# Altium PCB Catan_board.PcbDoc (part 1 of 3)
Units mm, origin at the board's own origin, x right, y up, seen from the top; angles counter-clockwise.
Board outline 80 x 59.64 mm, 2 copper layers (Top Layer, Bottom Layer), stack 1.448 mm thick; 132 components, 59 nets, 410 pads, 538 vias.
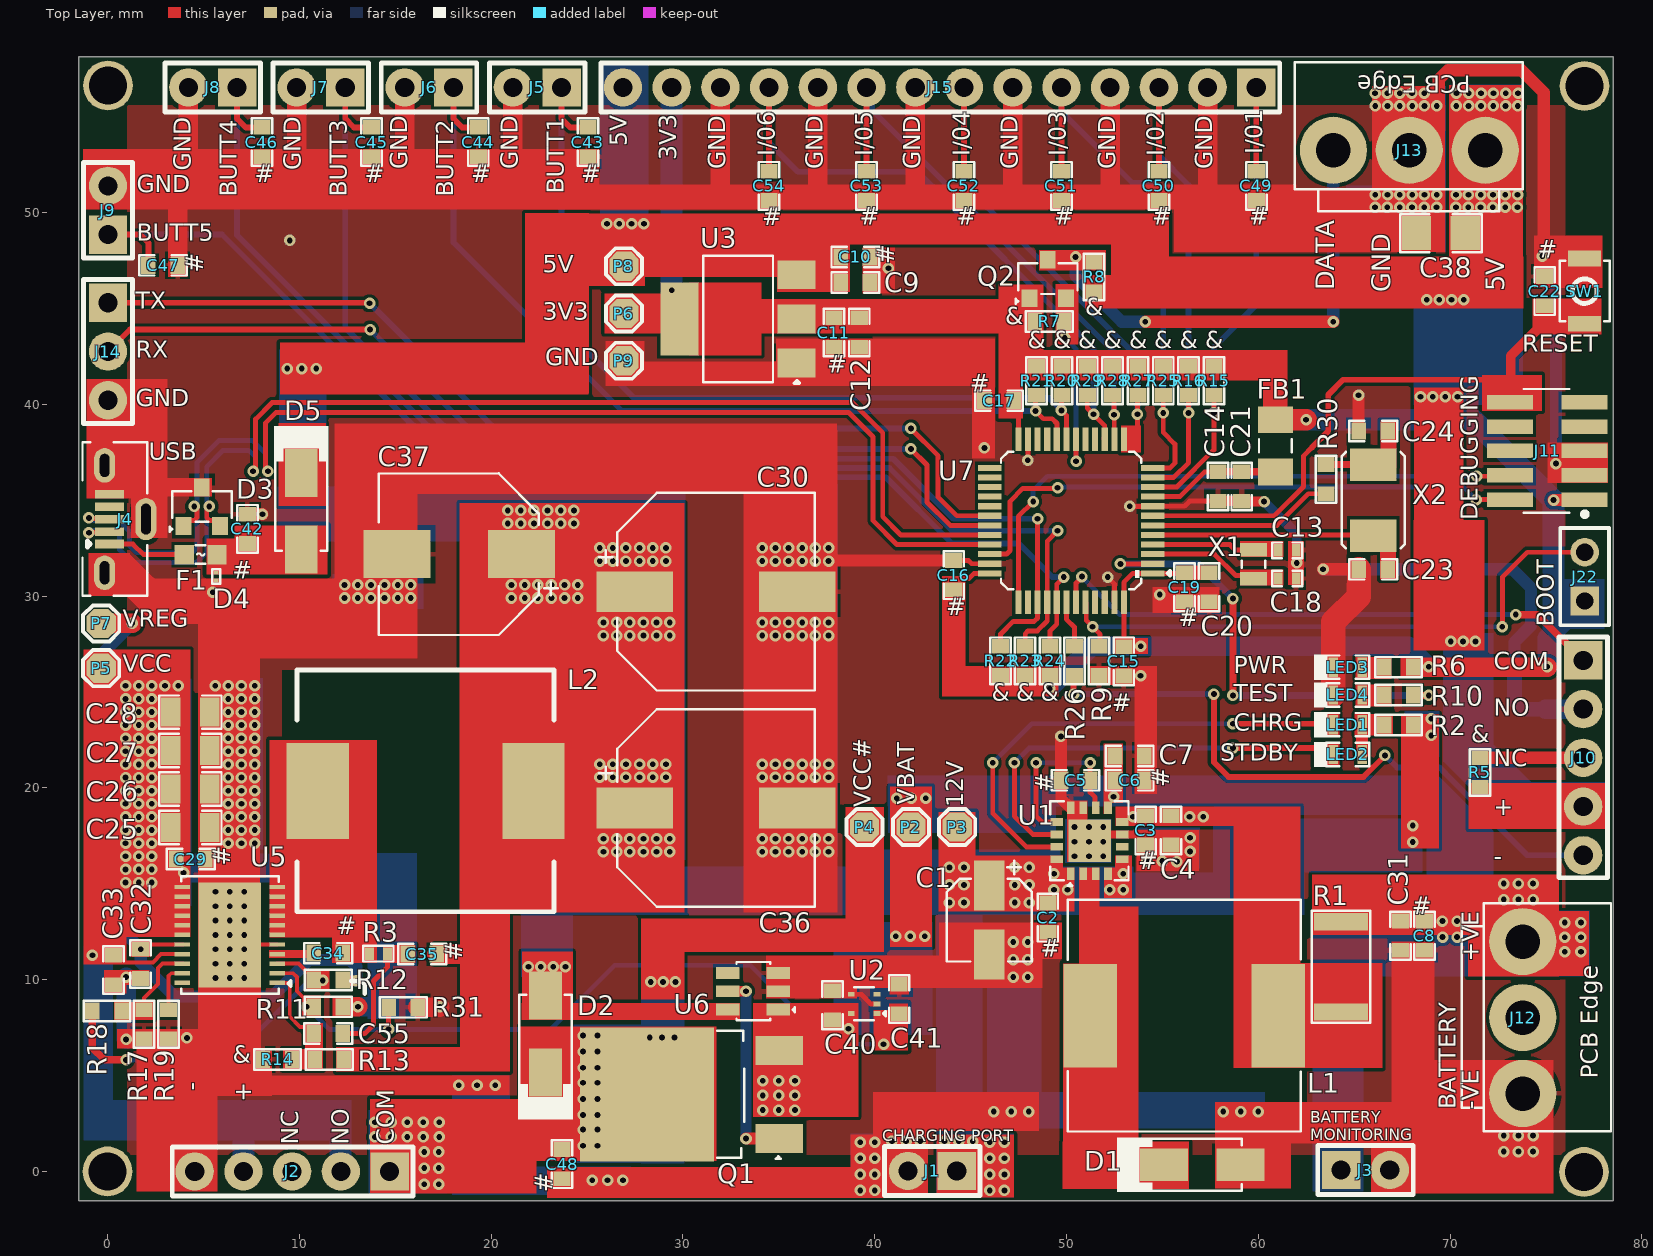
[diagram p0: Top Layer view]
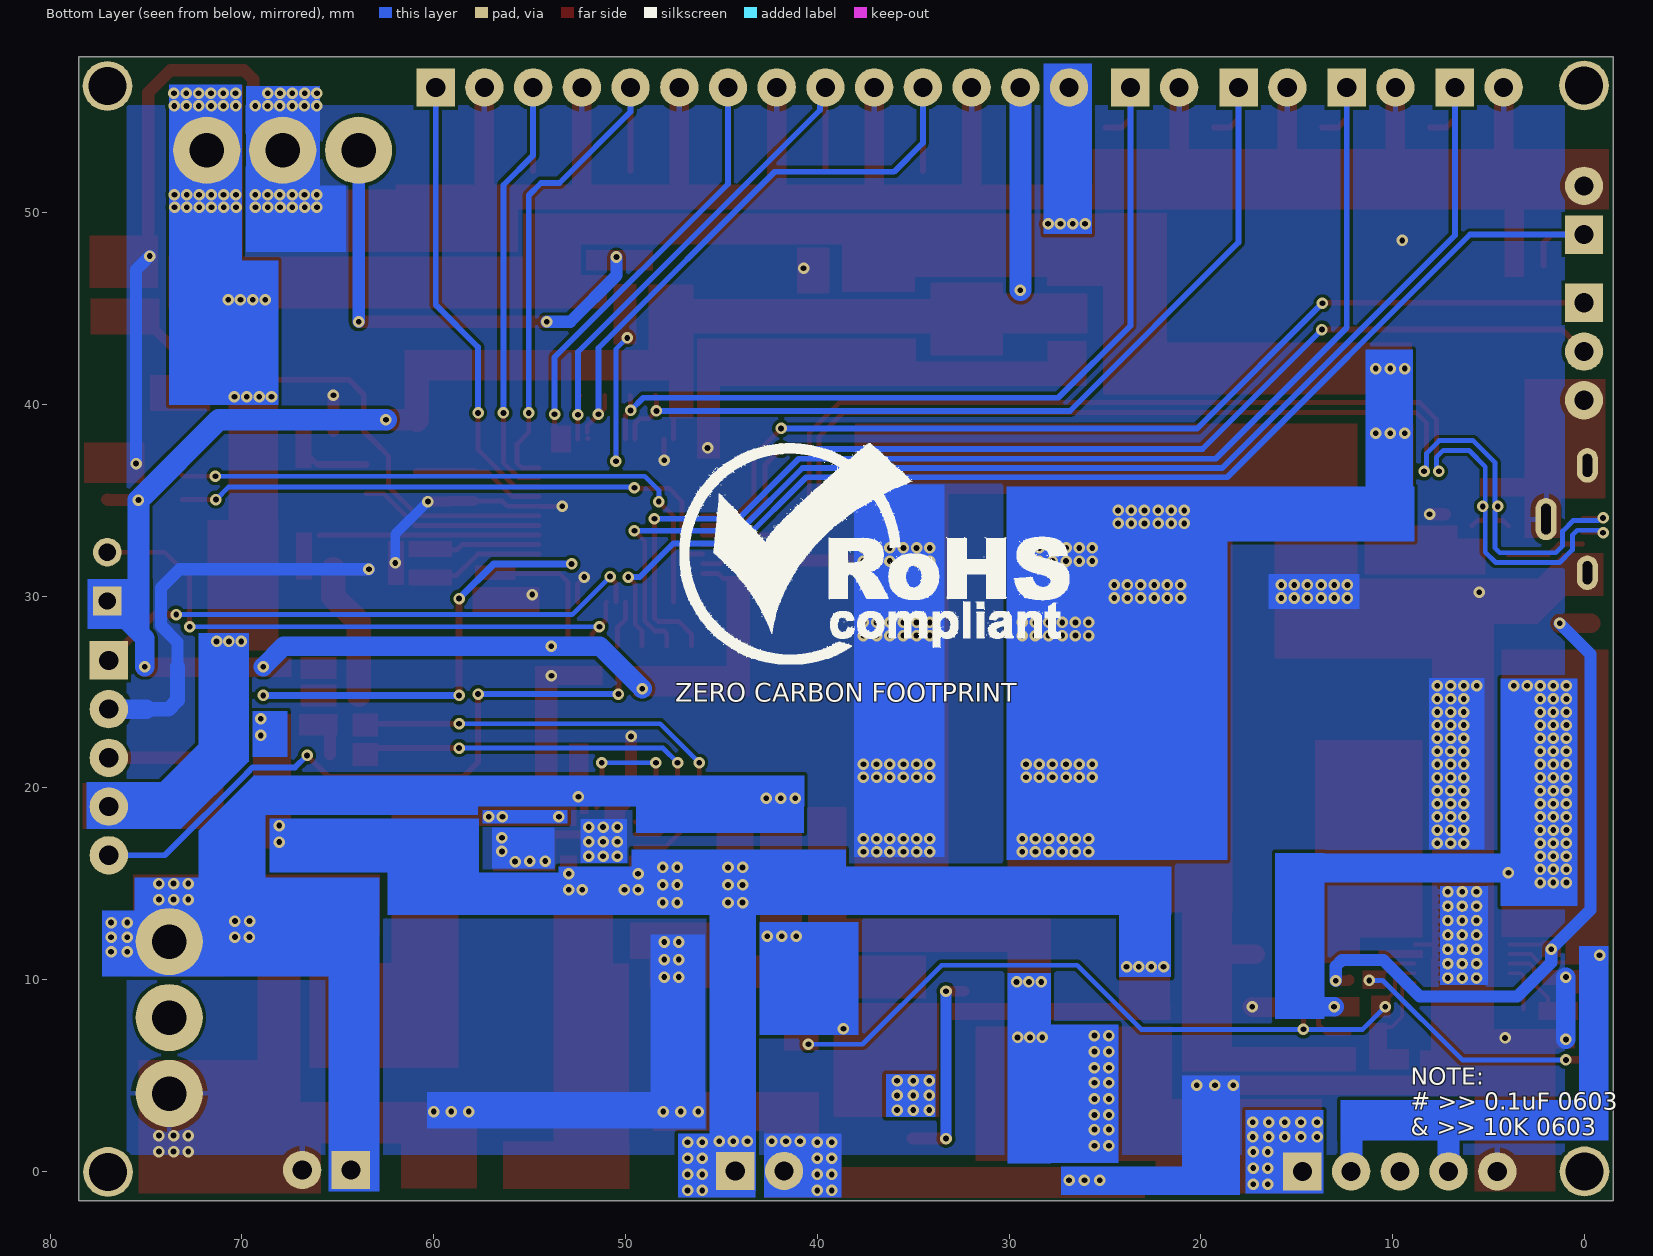
[diagram p1: Bottom Layer view, seen from below]
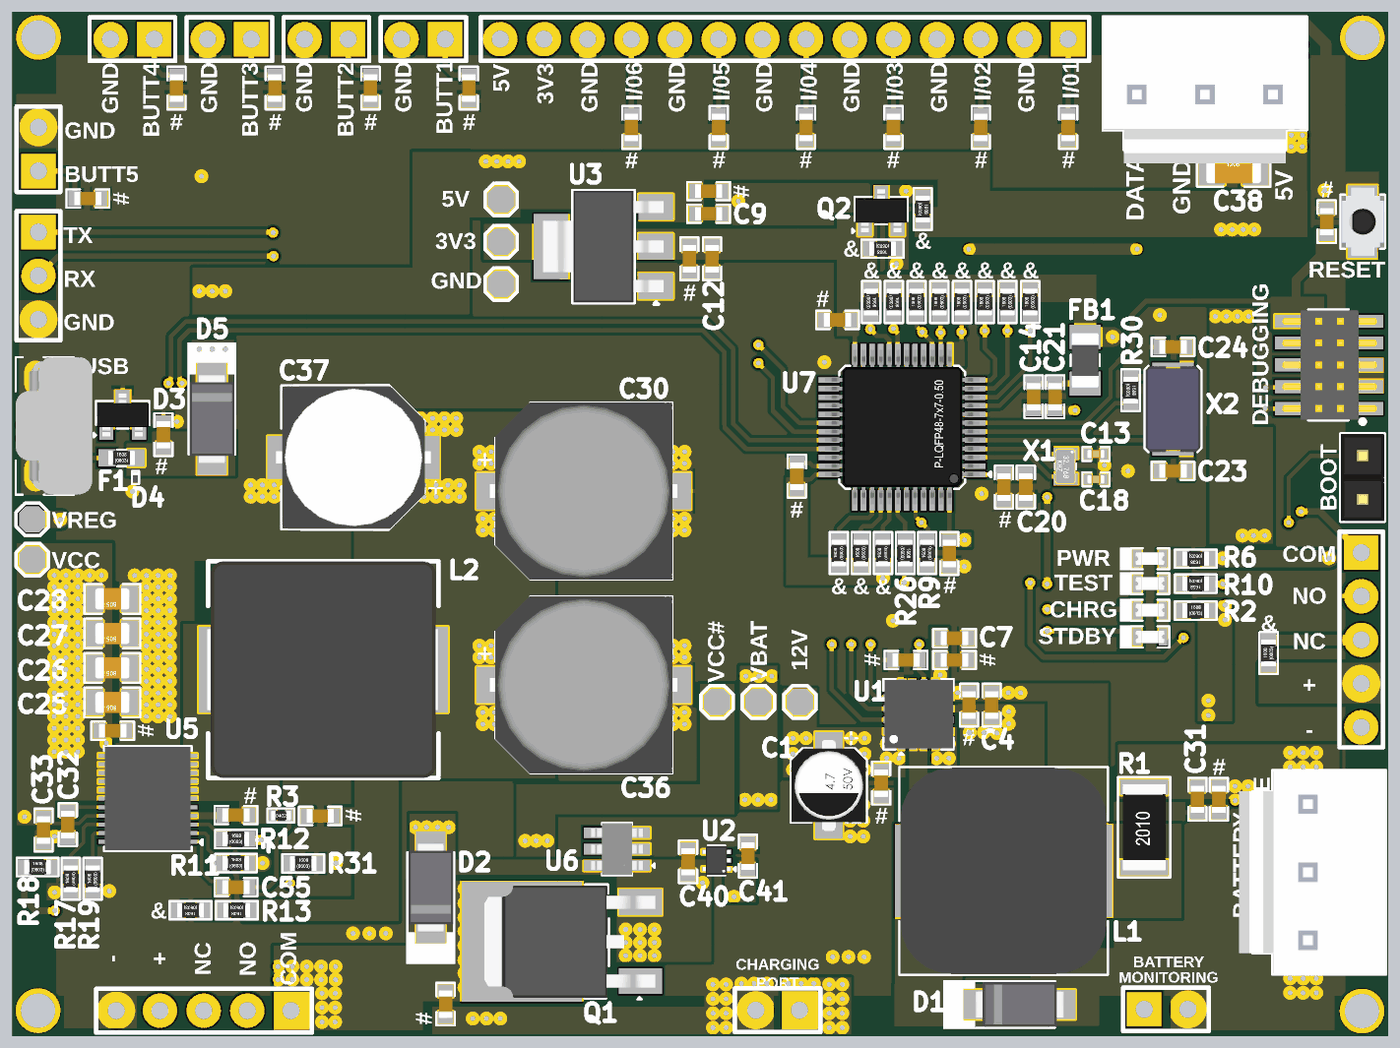
[diagram p3: 3D render of the assembled board from above, using the file's embedded part models]

## Layer stack, top to bottom
Top Solder: solder mask 0.0762, Solder Resist, Dk 3.5
Top Layer: signal copper 0.254
Dielectric 1: dielectric 0.9398, FR-4, Dk 4.8
Bottom Layer: signal copper 0.254
Bottom Solder: solder mask 0.0762, Solder Resist, Dk 3.5

## Board outline
-1.499,-1.524 -1.499,58.115 78.501,58.115 78.501,-1.524

## Design rules (kind name [scope] priority, off if disabled: settings)
Clearance [All] p1: gap=0.178 ignorepadtopadclearanceinfootprint=FALSE except(0: Arc-Hole Track-Hole SMDPad-Hole THPad-Hole Via-Hole Fill-Hole Poly-Hole Region-Hole Text-Hole; 0.102: Arc-SMDPad Track-SMDPad SMDPad-SMDPad)
DiffPairsRouting [All] p1: maxlimit=0.254 minlimit=0.254 mostfreqgap=0.254 toplayer_minwidth=0.254 toplayer_maxwidth=0.381 toplayer_prefwidth=0.254 bottomlayer_minwidth=0.254 bottomlayer_maxwidth=0.381 bottomlayer_prefwidth=0.254 maxuncoupledlength=12.7
HoleToHoleClearance [All] p1: gap=0.051 allowstackedmicrovias=TRUE
MatchedLengths "Schematic Matched Net Lengths" [InNetClass('USB')] p1: tolerance=1.27 checknetsindiffpair=TRUE checkdiffpairvsdiffpair=FALSE checkxsignals=FALSE checkothers=FALSE
MaxMinImpedance "Schematic Impedance Constraint" [InNetClass('USB')] p1: minimum=85.00 maximum=90.00
MinimumSolderMaskSliver [All] p1: minsoldermaskwidth=0
PlaneConnect [All] p1: pad.planeconnectstyle=Relief pad.reliefexpansion=0.508 pad.reliefentries=4 pad.reliefconductorwidth=0.254 pad.reliefairgap=0.254 via.planeconnectstyle=Direct via.reliefexpansion=0.508 via.reliefentries=4 via.reliefconductorwidth=0.254 via.reliefairgap=0.254
PolygonConnect [All] p1: thpad.connectstyle=Relief thpad.reliefconductorwidth=0.254 thpad.reliefentries=4 thpad.polygonreliefangle="90 Angle" thpad.airgapwidth=0.254 smdpad.connectstyle=Relief smdpad.reliefconductorwidth=0.254 smdpad.reliefentries=4 smdpad.polygonreliefangle="90 Angle" smdpad.airgapwidth=0.254 via.connectstyle=Direct via.reliefconductorwidth=0.254 via.reliefentries=4 via.polygonreliefangle="90 Angle" via.airgapwidth=0.254
RoutingVias [All] p1: holewidth=0.3 width=0.6 viastyle="Through Hole" minholewidth=0.3 minwidth=0.6 maxholewidth=0.3 maxwidth=0.6
SilkToSilkClearance [All] p1: silktosilkclearance=0
SilkToSolderMaskClearance [IsPad] p1: minsilkscreentomaskgap=0 clearancetoexposedcopper=TRUE
SolderMaskExpansion [All] p1: expansion=0.102 istentingtop=FALSE
Width [All] p1: maxlimit=2.54 minlimit=0.203 preferedwidth=0.635 minimp=50.000000 maximp=50.000000 favimp=50.000000
24 further rules are at their usual default settings.

## Classes and differential pairs
differential pair class USB_Lines: USB_D
net class USB: USB_D_N USB_D_P
component class U_Regulator-Section: C9 C10 C11 C12 C25 C26 C27 C28 C29 C30 C32 C33 C34 C35 C36 C37 C42 C55 D3 D4 D5 F1 J4 L2 LED3 P6 P7 P8 P9 R3 R6 R11 R12 R13 R14 R17 R18 R19 R31 U3 U5
component class U_MCU-Section: C13 C14 C15 C16 C17 C18 C19 C20 C21 C22 C23 C24 C38 FB1 J10 J11 J13 J22 LED4 Q2 R5 R7 R8 R9 R10 R15 R16 R20 R21 R22 R23 R24 R25 R26 R27 R28 R29 R30 SW1 U4 U7 X1 X2
component class U_GPIOs_Power: C43 C44 C45 C46 C47 C49 C50 C51 C52 C53 C54 J5 J6 J7 J8 J9 J14 J15
component class U_Battery_Management: C1 C2 C3 C4 C5 C6 C7 C8 C31 C40 C41 C48 D1 D2 J1 J2 J3 J12 L1 LED1 LED2 P2 P3 P4 P5 Q1 R1 R2 U1 U2 U6
differential pair USB_D: +USB_D_P -USB_D_N

## Components (designator, comment, footprint, x,y, rotation, side; value= is the part's Value field where it differs from the comment)
C1 "10uF" RVT1E100M0405_ 45.974,13.106 r270 top locked
C2 "0.1uF" Cap-0603 49.022,13.233 r90 top locked
C3 "0.1uF" Cap-0603 54.127,17.78 r90 top locked
C4 "10uF" Cap-0603 55.448,17.78 r90 top locked
C5 "0.1uF" Cap-0603 50.47,20.396 r0 top locked
C6 "0.1uF" Cap-0603 53.289,20.396 r180 top locked
C7 "10uF" Cap-0603 53.289,21.666 r180 top locked
C8 "0.1uF" Cap-0603 68.656,12.294 r90 top locked
C9 "10uF" Cap-0603 38.989,46.355 r180 top locked
C10 "0.1uF" Cap-0603 38.989,47.676 r180 top locked
C11 "0.1uF" Cap-0603 37.871,43.739 r90 top locked
C12 "22uF" Cap-0603 39.192,43.739 r90 top locked
C13 "7pF" Cap-0402 61.506,32.385 r180 top locked
C14 "10nF" Cap-0603 57.887,35.712 r90 top locked
C15 "0.1uF" Cap-0603 52.984,26.594 r90 top locked
C16 "0.1uF" Cap-0603 44.12,31.09 r270 top locked
C17 "0.1uF" Cap-0603 46.482,40.183 r0 top locked
C18 "7pF" Cap-0402 61.506,30.912 r180 top locked
C19 "0.1uF" Cap-0603 56.159,30.455 r90 top locked
C20 "4.7uF" Cap-0603 57.429,30.455 r90 top locked
C21 "1uF" Cap-0603 59.131,35.712 r90 top locked
C22 "0.1uF" Cap-0603 74.93,45.898 r270 top locked
C23 "20pF" Cap-0603 65.989,31.394 r180 top locked
C24 "20pF" Cap-0603 65.989,38.608 r180 top locked
C25 "22uF" Cap-0805 4.318,17.932 r180 top locked
C26 "22uF" Cap-0805 4.318,19.939 r180 top locked
C27 "22uF" Cap-0805 4.318,21.946 r180 top locked
C28 "22uF" Cap-0805 4.318,23.952 r180 top locked
C29 "0.1uF" Cap-0603 4.343,16.281 r180 top locked
C30 "1000uF" UUD1A102MNL1GS 31.725,30.226 r0 top locked value=1mF
C31 "4.7uF" Cap-0603 67.412,12.294 r90 top locked
C32 "1uF" Cap-0603 1.727,10.82 r270 top locked
C33 "1uF" Cap-0603 0.318,10.503 r90 top locked
C34 "0.1uF" Cap-0603 11.506,11.379 r180 top locked
C35 "0.1uF" Cap-0603 16.408,11.328 r180 top
C36 "1000uF" UUD1A102MNL1GS 31.725,18.948 r0 top locked value=1mF
C37 "560uF" GVT1C561M0810 18.339,32.182 r180 top locked
C38 "100uF" Cap-1206 69.52,48.92 r0 top
C40 "1uF" Cap-0603 37.795,8.661 r270 top locked
C41 "1nF" CAP-0603 41.275,8.992 r270 top locked
C42 "0.1uF" Cap-0603 7.29,33.503 r270 top locked
C43 "0.1uF" Cap-0603 25.044,53.67 r90 top locked
C44 "0.1uF" Cap-0603 19.329,53.67 r90 top locked
C45 "0.1uF" Cap-0603 13.767,53.67 r90 top locked
C46 "0.1uF" Cap-0603 8.052,53.67 r90 top locked
C47 "0.1uF" Cap-0603 2.896,47.244 r180 top locked
C48 "0.1uF" Cap-0603 23.698,0.381 r90 top locked
C49 "0.1uF" Cap-0603 59.893,51.384 r270 top locked
C50 "0.1uF" Cap-0603 54.813,51.384 r270 top locked
C51 "0.1uF" Cap-0603 49.733,51.384 r270 top locked
C52 "0.1uF" Cap-0603 44.653,51.384 r270 top locked
C53 "0.1uF" Cap-0603 39.573,51.384 r270 top locked
C54 "0.1uF" Cap-0603 34.493,51.384 r270 top locked
C55 "1nF" Cap-0603 11.506,7.188 r180 top locked
D1 "SS34" SMA 57.074,0.356 r0 top locked
D2 "SS34" SMA 22.835,7.163 r90 top locked
D3 "ESD5302F-3/TR" Sot-23 4.917,34.655 r0 top locked
D4 "PESD5V0H1BSFYL" DSN0603-2 5.664,31.013 r270 top locked
D5 "SS34" SMA 10.109,34.417 r270 top locked
F1 "SMD0603-050" Fuse-0603 4.851,32.156 r0 top locked
FB1 "100MHz" IND-1206 60.884,37.834 r270 top locked
J1 "2P THrough Hole Pads" "2P THrough Hole Pads" 43.002,0.025 r180 top locked
J2 "5P Through Hole Pads" "5P Through Hole Pads" 9.627,0 r180 top locked
J3 "2P THrough Hole Pads" "2P THrough Hole Pads" 65.583,0.076 r0 top locked
J4 "105133-0011" 1051330011 0.927,34.011 r90 top locked
J5 "2P THrough Hole Pads" "2P THrough Hole Pads" 22.403,56.515 r180 top locked
J6 "2P THrough Hole Pads" "2P THrough Hole Pads" 16.764,56.515 r180 top locked
J7 "2P THrough Hole Pads" "2P THrough Hole Pads" 11.125,56.515 r180 top locked
J8 "2P THrough Hole Pads" "2P THrough Hole Pads" 5.486,56.515 r180 top locked
J9 "2P THrough Hole Pads" "2P THrough Hole Pads" 0.025,50.114 r90 top locked
J10 "5P Through Hole Pads" "5P Through Hole Pads" 76.937,21.565 r270 top locked
J11 "20021121-00010C4LF" 20021121-00010C4LF_ 75.063,37.567 r90 top locked
J12 "DNP" B3P-VH(LF)(SN) 73.787,8.024 r90 top locked
J13 "B3P-VH(LF)(SN)" B3P-VH(LF)(SN) 67.869,53.238 r180 top locked
J14 "UART" "3P Through Hole Pads" 0.025,42.748 r270 top locked
J15 "DNP" "14P Through Hole Pads_" 43.383,56.515 r180 top locked
J22 "22284020" HDR1X2_ 77.013,29.743 r90 top locked
L1 "22UH" YPRH1204-220M_ 56.132,8.128 r0 top locked
L2 "2.2uH" BCIH1367-2R2M 16.586,19.837 r0 top locked
LED1 "Emerald" LED-0603 64.656,23.292 r180 top locked
LED2 "RED" LED-0603 64.656,21.742 r180 top locked
LED3 "RED" LED-0603 64.656,26.289 r180 top locked
LED4 "RED" LED-0603 64.656,24.841 r180 top locked
P2 "TEST POINT" Test-point 41.885,17.958 r270 top locked
P3 "TEST POINT" Test-point 44.298,17.958 r270 top locked
P4 "TEST POINT" Test-point 39.472,17.958 r270 top locked
P5 "TEST POINT" Test-point -0.33,26.238 r0 top locked
P6 "TEST POINT" Test-point 26.924,44.729 r180 top locked
P7 "TEST POINT" Test-point -0.33,28.575 r0 top locked
P8 "TEST POINT" Test-point 26.924,47.193 r0 top locked
P9 "TEST POINT" Test-point 26.924,42.266 r270 top locked
Q1 "20P03-HXY" TO-252-2L 31.572,4.013 r90 top locked
Q2 "BSS138" Sot-23 49.022,46.533 r0 top locked
R1 "0.05R" RES-2010 64.313,10.668 r90 top locked
R2 "1K" Res-0603 67.31,23.266 r180 top locked
R3 "1.54k" Res-0402 14.122,11.354 r0 top
R5 "10K" Res-0603 71.552,20.803 r270 top locked
R6 "1K" Res-0603 67.31,26.289 r0 top locked
R7 "10K" Res-0603 49.098,44.323 r0 top locked
R8 "10K" Res-0603 51.435,46.634 r90 top locked
R9 "33K" Res-0603 51.699,26.619 r270 top locked
R10 "1K" Res-0603 67.31,24.841 r0 top locked
R11 "100K" Res-0603 11.506,8.585 r180 top locked
R12 "100K" Res-0603 11.506,9.982 r180 top locked
R13 "73.2K" Res-0603 11.557,5.842 r0 top locked value=73.2kR
R14 "10K" Res-0603 8.865,5.842 r0 top locked
R15 "10K" Res-0603 57.683,41.224 r270 top locked
R16 "10K" Res-0603 56.363,41.224 r270 top locked
R17 "200K" Res-0603 1.905,7.671 r270 top locked
R18 "DNP" Res-0603 -0.025,8.357 r180 top locked
R19 "147K" Res-0603 3.175,7.671 r270 top locked value=147kR
R20 "10K" Res-0603 49.759,41.224 r90 top locked
R21 "10K" Res-0603 48.438,41.224 r90 top locked
R22 "10K" Res-0603 46.558,26.619 r270 top locked
R23 "10K" Res-0603 47.843,26.619 r270 top locked
R24 "10K" Res-0603 49.129,26.619 r270 top locked
R25 "10K" Res-0603 55.042,41.224 r270 top locked
R26 "200R" Res-0603 50.414,26.619 r90 top locked
R27 "10K" Res-0603 53.721,41.224 r270 top locked
R28 "10K" Res-0603 52.4,41.224 r270 top locked
R29 "10K" Res-0603 51.079,41.224 r270 top locked
R30 "390R" Res-0603 63.525,36.093 r90 top locked
R31 "50K" Res-0603 15.418,8.56 r180 top
SW1 "B3U-1000P" B3U-1000P 77.013,45.896 r90 top locked
U1 "TP5100" TQFN-16-EP(4x4)_ 51.206,17.246 r90 top locked
U2 "BD4860FVE-TR" VSOF-5 39.446,8.738 r180 top locked
U3 "AZ1117CH-3.3TRG1" "SOT- 223" 32.868,44.45 r90 top locked
U5 "TPS53319DQPR" "22-LSON-CLIP (6x5)" 6.375,12.332 r180 top locked
U6 "LTC4412IS6#TRPBF" SOT-23-6 33.655,9.398 r180 top locked
U7 "STM32F070CBT6TR" "48-LQFP (7x7)_" 50.241,33.934 r180 top locked
X1 "32.768kHz" SMD2012-2P 59.741,31.66 r270 top locked
X2 "8MHz" SMD5032-2P 65.989,34.997 r270 top locked

## Footprints (in the part's own frame and the unit in brackets; to place one, negate y for a bottom-side part, rotate by r counter-clockwise, add the part's x,y. Pads: shape width x height; smd on the part's side, far side on the other; paste and mask are expansions set on the pad)
"2P THrough Hole Pads" [mm]
  rect 2x2 hole 1: 1(-1.27,0)
  round 2 hole 1: 2(1.27,0)
  silkscreen extent -2.49,-1.27 2.49,1.27
"3P Through Hole Pads" [mm]
  rect 2x2 hole 1: 1(-2.54,0)
  round 2 hole 1: 2(0,0) 3(2.54,0)
  silkscreen extent -3.76,-1.27 3.76,1.27
"5P Through Hole Pads" [mm]
  rect 2x2 hole 1: 1(-5.08,0)
  round 2 hole 1: 2(-2.54,0) 3(0,0) 4(2.54,0) 5(5.08,0)
  silkscreen extent -6.3,-1.27 6.25,1.27
"14P Through Hole Pads_" [mm]
  rect 2x2 hole 1: 1(-16.51,0)
  round 2 hole 1: 2(-13.97,0) 3(-11.43,0) 4(-8.89,0) 5(-6.35,0) 6(-3.81,0) 7(-1.27,0) 8(1.27,0) 9(3.81,0) 10(6.35,0) 11(8.89,0) 12(11.43,0) 13(13.97,0) 14(16.51,0)
  silkscreen extent -17.73,-1.27 17.65,1.27
"22-LSON-CLIP (6x5)" [mm]
  rect 0.8x0.23 smd: 1(-2.475,2.5) 2(-2.475,2) 3(-2.475,1.5) 4(-2.475,1) 5(-2.475,0.5) 6(-2.475,0) 7(-2.475,-0.5) 8(-2.475,-1) 9(-2.475,-1.5) 10(-2.475,-2) 11(-2.475,-2.5) 12(2.475,-2.5) 13(2.475,-2) 14(2.475,-1.5) 15(2.475,-1) 16(2.475,-0.5) 17(2.475,0) 18(2.475,0.5) 19(2.475,1) 20(2.475,1.5) 21(2.475,2) 22(2.475,2.5)
  rect 3.24x5.48 smd: 23(0,0)
  round 0.6 hole 0.3: ""(-0.75,2.25) ""(-0.75,1.5) ""(-0.75,0.75) ""(-0.75,0) ""(-0.75,-0.75) ""(-0.75,-1.5) ""(-0.75,-2.25) ""(0,2.25) ""(0,1.5) ""(0,0.75) ""(0,0) ""(0,-0.75) ""(0,-1.5) ""(0,-2.25) ""(0.75,2.25) ""(0.75,1.5) ""(0.75,0.75) ""(0.75,0) ""(0.75,-0.75) ""(0.75,-1.5) ""(0.75,-2.25)
  silkscreen extent -3.18,-3.06 2.54,3.06, body extent -2.5,-3 2.5,3, height 1.5
"48-LQFP (7x7)_" [mm]
  rect 1.22x0.32 smd: 1(-4.25,2.75) 2(-4.25,2.25) 3(-4.25,1.75) 4(-4.25,1.25) 5(-4.25,0.75) 6(-4.25,0.25) 7(-4.25,-0.25) 8(-4.25,-0.75) 9(-4.25,-1.25) 10(-4.25,-1.75) 11(-4.25,-2.25) 12(-4.25,-2.75) 25(4.25,-2.75) 26(4.25,-2.25) 27(4.25,-1.75) 28(4.25,-1.25) 29(4.25,-0.75) 30(4.25,-0.25) 31(4.25,0.25) 32(4.25,0.75) 33(4.25,1.25) 34(4.25,1.75) 35(4.25,2.25) 36(4.25,2.75)
  rect 0.32x1.22 smd: 13(-2.75,-4.25) 14(-2.25,-4.25) 15(-1.75,-4.25) 16(-1.25,-4.25) 17(-0.75,-4.25) 18(-0.25,-4.25) 19(0.25,-4.25) 20(0.75,-4.25) 21(1.25,-4.25) 22(1.75,-4.25) 23(2.25,-4.25) 24(2.75,-4.25) 37(2.75,4.25) 38(2.25,4.25) 39(1.75,4.25) 40(1.25,4.25) 41(0.75,4.25) 42(0.25,4.25) 43(-0.25,4.25) 44(-0.75,4.25) 45(-1.25,4.25) 46(-1.75,4.25) 47(-2.25,4.25) 48(-2.75,4.25)
  silkscreen extent -5.16,-3.58 3.66,3.58, body extent -4.51,-4.51 4.49,4.49, height 1.43
20021121-00010C4LF_ [mm]
  rect 0.76x2.4 smd: 1(-2.54,-1.95) 2(-2.54,1.95) 3(-1.27,-1.95) 4(-1.27,1.95) 5(0,-1.95) 6(0,1.95) 7(1.27,-1.95) 8(1.27,1.95) 9(2.54,-1.95) 10(2.54,1.95)
  silkscreen extent -3.43,-2.08 3.23,1.22, body extent -3.17,-2.78 3.18,2.72, height 4.5
1051330011 [mm]
  rect 0.45x1.5 smd: 1(-1.3,0.825) 2(-0.65,0.825) 3(0,0.825) 4(0.65,0.825) 5(1.3,0.825)
  oval 1.8x1.1 hole 0.5 slot 1.2 at 0 deg: SH1(-2.8,1.075) SH2(2.8,1.075)
  oval 2.2x1.1 hole 0.5 slot 1.6 at 0 deg: SH3(0,-1.075)
  silkscreen extent -4,-1.15 4,2.23, body extent -4.01,-2.22 4.01,2.22, height 7.48
B3P-VH(LF)(SN) [mm]
  round 3.5 hole 1.8: 1(-3.96,0) 2(0,0) 3(3.96,0)
  silkscreen extent -5.92,-4.6 5.97,3.18, body extent -5.88,-4.55 5.94,3.95, height 11.45
B3U-1000P [mm] "SWITCH TACTILE SPST-NO 0.05A 12V"
  rect 0.82x1.72 smd: 1(-1.7,0) 2(1.7,0)
  silkscreen extent -1.57,-1.3 1.57,1.3, body extent -2,-1.26 2,1.24, height 1.6
BCIH1367-2R2M [mm]
  rect 3.25x5 smd: 1(-5.625,0) 2(5.625,0)
  silkscreen extent -6.7,-6.3 6.7,6.3, body extent -6.74,-6.3 6.66,6.3, height 6.7
Cap-0402 [mil]
  rect 18x25 smd mask+2.36: 1(-18.5,0) 2(18.5,0)
  silkscreen extent -31,-16 31,16, body extent -20,-10 20,10, height 19
Cap-0603 [mil]
  rect 30x35 smd mask+2.36: 1(-30,0) 2(30,0)
  silkscreen extent -49,-21 49,21, body extent -32,-16 31,16, height 34
CAP-0603 [mil]
  rect 30x35 smd mask+2.36: 1(-30,0) 2(30,0)
  silkscreen extent -49,-21 49,21, body extent -32,-16 31,16, height 34
Cap-0805 [mil] "SMD 0805"
  rect 40x60 smd mask+2.76: 1(-40,0) 2(40,0)
  silkscreen extent -64,-34 64,34, body extent -39,-25 39,25, height 30
Cap-1206 [mil] "SMD 1206"
  rect 60x70 smd: 1(-50,0) 2(50,0)
  silkscreen extent -84,-39 84,39, body extent -63,-31 63,32, height 39
DSN0603-2 [mm]
  rect 0.2x0.24 smd mask+0.055: 1(-0.2,0) 2(0.2,0)
  silkscreen extent -0.38,-0.2 0.38,0.2, body extent -0.3,-0.15 0.3,0.15, height 0.32
Fuse-0603 [mm]
  rect 1x1 smd: 1(-0.85,0) 2(0.85,0)
  silkscreen extent -0.25,-0.48 0.25,0.48, body extent -0.77,-0.42 0.78,0.43, height 0.45
GVT1C561M0810 [mm]
  rect 3.5x2.5 smd: 1(-3.25,0) 2(3.25,0)
  silkscreen extent -5.13,-4.21 4.19,4.21, body extent -4.5,-4.15 4.5,4.15, height 10.48
HDR1X2_ [mm] "CONN HEADER VERT 2POS 2.54MM"
  rect 1.5x1.5 hole 0.9: 1(0,0)
  round 1.5 hole 0.9: 2(2.54,0)
  silkscreen extent -1.27,-1.27 3.81,1.27, body extent -1.27,-1.27 3.81,1.27, height 8.44
IND-1206 [mm]
  rect 1.4x1.82 smd: 1(-1.36,0) 2(1.36,0)
  silkscreen extent -0.34,-0.85 0.34,0.85, body extent -1.6,-0.8 1.6,0.8, height 1.3
LED-0603 [mm]
  rect 0.5x1 smd: 1(-0.75,0) 2(0.75,0)
  silkscreen extent -1.12,-0.66 1.75,0.66, body extent -0.82,-0.37 0.82,0.36, height 0.68
Res-0402 [mil]
  rect 18x25 smd mask+2.17: 1(-18.5,0) 2(18.5,0)
  silkscreen extent -32,-17 32,16, body extent -23,-11 23,11, height 16
Res-0603 [mil]
  rect 30x35 smd: 1(-30,0) 2(30,0)
  silkscreen extent -48,-21 48,21, body extent -31,-17 31,17, height 18
RES-2010 [mm]
  rect 0.9x2.8 smd: 1(-2.35,0) 2(2.35,0)
  silkscreen extent -2.92,-1.52 2.92,1.52, body extent -2.5,-1.25 2.5,1.25, height 0.6
RVT1E100M0405_ [mm] "10uF 25V 5.4mm SMD"
  rect 2.6x1.6 smd: 1(-1.8,0) 2(1.8,0)
  silkscreen extent -3.1,-2.22 2.16,2.22, body extent -2.65,-2.15 2.65,2.15, height 5.7
SMA [mm]
  rect 2.5x1.7 smd: 1(-2,0) 2(2,0)
  silkscreen extent -4.45,-1.42 2.06,1.42, body extent -2.6,-1.3 2.6,1.3, height 2.4
SMD2012-2P [mm]
  rect 0.7x1.4 smd: 1(-0.75,0) 2(0.75,0)
  silkscreen extent -0.18,-0.61 0.18,0.61, body extent -1.02,-0.62 1.03,0.58, height 0.6
SMD5032-2P [mm]
  rect 1.7x2.4 smd: 1(-1.85,0) 2(1.85,0)
  silkscreen extent -2.51,-1.65 2.51,1.65, body extent -2.5,-1.6 2.5,1.6, height 1.3
Sot-23 [mm] "TRANS NPN 40V 0.6A SOT23"
  rect 0.82x0.92 smd: 1(-0.95,-1) 2(0.95,-1) 3(0,1)
  silkscreen extent -1.68,-1.3 1.55,0.81, body extent -1.5,-1.25 1.5,1.25, height 1.05
SOT-23-6 [mm]
  rect 1.22x0.62 smd: 1(-1.31,0.95) 2(-1.31,0) 3(-1.31,-0.95) 4(1.31,-0.95) 5(1.31,0) 6(1.31,0.95)
  silkscreen extent -2.18,-1.52 0.86,1.52, body extent -1.5,-1.5 1.5,1.5, height 1.47
"SOT- 223" [mm]
  rect 1.5x2 smd: 1(-2.3,-3.05) 2(0,-3.05) 3(2.3,-3.05)
  rect 3.8x2 smd: 4(0,3.05)
  silkscreen extent -3.35,-3.2 3.3,1.8, body extent -3.25,-3.5 3.25,3.5, height 1.61
Test-point [mil]
  oct 60x60 smd: 1(0,0)
  silkscreen extent -37,-37 37,37
TO-252-2L [mm]
  rect 1.5x2.5 smd: 1(-2.3,-3.45) 3(2.3,-3.45)
  rect 7x7 smd: 2(0,3.45)
  silkscreen extent -3.35,-3.53 3.33,-0.2, body extent -3.27,-4.31 3.27,5.63, height 2.34
TQFN-16-EP(4x4)_ [mm]
  rect 0.65x0.4 smd: 1(-1.725,0.991) 2(-1.725,0.341) 3(-1.725,-0.309) 4(-1.725,-0.959) 9(1.725,-0.959) 10(1.725,-0.309) 11(1.725,0.341) 12(1.725,0.991)
  rect 0.4x0.65 smd: 5(-0.975,-1.692) 6(-0.325,-1.692) 7(0.325,-1.692) 8(0.975,-1.692) 13(0.975,1.725) 14(0.325,1.725) 15(-0.325,1.725) 16(-0.975,1.725)
  rect 2.2x2.2 smd: 17(0,0)
  silkscreen extent -2.36,-2.02 2.06,2.06, body extent -2,-2 2,2, height 0.9
UUD1A102MNL1GS [mm]
  rect 3.99x2.12 smd: 1(-4.24,0) 2(4.24,0)
  silkscreen extent -6.1,-5.15 5.15,5.15, body extent -5.45,-5.15 5.45,5.15, height 10.2
VSOF-5 [mm]
  rect 0.35x0.25 smd: 1(-0.675,0.5) 2(-0.675,0) 3(-0.675,-0.5) 4(0.675,-0.5) 5(0.675,0.5)
  silkscreen extent -1.12,-0.86 0.51,0.86, body extent -0.8,-0.82 0.8,0.82, height 0.6
YPRH1204-220M_ [mm]
  rect 2.8x5.4 smd: 1(-4.9,0) 2(4.9,0)
  silkscreen extent -6.06,-6.05 6.07,6.05, body extent -5.99,-6 6.01,6, height 5

## Part data
C1: library part RVT1E100M0405, "CAP ALUM 10uF 25V SMD", LCSC Part Number=C970655, Manufacturer=ROQANG, Operating Temperature=-45℃~+105℃, Rated Voltage=25V, Tolerance=±20%, Capacitance=10uF, ComponentLink1Description=LCSC, ComponentLink1URL=https://www.lcsc.com/product-detail/Aluminum-Electrolytic-Capacitors-SMD_10uF-25V-20_C72484.html, Item Type=Capacitor, L=5.4mm, Manufacturer Part Number=RVT1E100M0405, φD=4mm
C2 C3 C5 C6 C8 C10 C11 C15 C16 C17 C19 C22 C29 C34 C35 C42 C43 C44 C45 C46 C47 C48 C49 C50 C51 C52 C53 C54: library part CC0603KRX5R9BB104, "CAP CER 0.1UF 50V X5R 0603", Capacitance=100nF, Case Code (Imperial)=0603, Case Code (Metric)=1608, Dielectric=X5R, LCSC Part Number=C110022, Manufacturer=Yageo, Max Operating Temperature=85°C, Min Operating Temperature=-55°C, Package Quantity=4000, Supplier Part Number 1=311-4046-1-ND, Tolerance=10%, Voltage Rating=50V, Case/Package=0603, Category="Ceramic Capacitors", ComponentLink1Description=http://www.mouser.com/ds/2/447/Yageo_UPY-GP_NP0_16V-to-50V_9-358835.pdf?src-supplier=Mouser, ComponentLink1URL=http://www.mouser.com/ds/2/447/Yageo_UPY-GP_NP0_16V-to-50V_9-358835.pdf?src-supplier=Mouser, ComponentLink2Description=https://www.yageo.com/upload/media/product/productsearch/datasheet/mlcc/UPY-GPHC_X5R_4V-to-50V_26.pdf?src-supplier=Digi-Key, ComponentLink2URL=https://www.yageo.com/upload/media/product/productsearch/datasheet/mlcc/UPY-GPHC_X5R_4V-to-50V_26.pdf?src-supplier=Digi-Key, ComponentLink3Description=http://www.yageo.com/exep/pages/download/literatures/ProductSelectionGuide%202014_Final_2.pdf?src-supplier=Digi-Key, ComponentLink3URL=http://www.yageo.com/exep/pages/download/literatures/ProductSelectionGuide%202014_Final_2.pdf?src-supplier=Digi-Key, Halogen Free="Halogen Free", Item Type=Capacitor, Lead Free="Lead Free", Length=0.063inch, Manufacturer Part Number=CC0603KRX5R9BB104, Mount="Surface Mount", Packaging="Tape and Reel", Pricing 1="1=0.10000, 10=0.05200, 50=0.02820, 100=0.02310, 500=0.01648, 1000=0.01294 (USD)", RoHS=Yes, Stock 1=152253, Supplier 1=Digi-Key, Termination=SMD/SMT, Thickness=0.035inch, Voltage Rating (DC)=50V, Weight=7.1E-05oz, Width=0.031inch
C4 C7 C9: library part CL10A106MA8NRNC, "CAP CER 10UF 25V X5R 0603", Case Code (Imperial)=0603, Case Code (Metric)=1608, Dielectric=X5R, LCSC Part Number=C96446, Manufacturer=Samsung, Max Operating Temperature=85°C, Min Operating Temperature=-55°C, Package Quantity=1, Tolerance=20%, Voltage Rating=25V, Capacitance=10uF, Case/Package=0603, Category="Ceramic Capacitors", ComponentLink1Description=https://datasheet.ciiva.com/25766/cl10a106ma8nrnc-25766562.pdf?src-supplier=Digi-Key, ComponentLink1URL=https://datasheet.ciiva.com/25766/cl10a106ma8nrnc-25766562.pdf?src-supplier=Digi-Key, Construction=Flat, Contact Plating=Tin, Lead Free="Lead Free", Length=0.063inch, Manufacturer Part Number=CL10A106MA8NRNC, Mount="Surface Mount", Packaging="Tape and Reel", Pricing 1="4000=0.03753, 8000=0.03700, 16000=0.03595, 24000=0.03515, 32000=0.03383, 40000=0.03304, 400000=0.03225 (USD)", RoHS=Yes, RoHS Compliant=Yes, Series=CL, Supplier 1=Avnet, Supplier Part Number 1=CL10A106MA8NRNC, Termination=Wraparound, Thickness=0.035inch, Width=0.031inch
C12: library part CC0603MRX5R6BB226, "CAP CER 22UF 10V X5R 0603", Case Code (Imperial)=0603, Case Code (Metric)=1608, Dielectric=X5R, LCSC Part Number=C109447, Manufacturer=Yageo, Max Operating Temperature=85°C, Min Operating Temperature=-55°C, Package Quantity=4000, Supplier Part Number 1=311-1819-1-ND, Tolerance=20%, Voltage Rating=10V, Capacitance=22uF, Case/Package=0603, Category="Ceramic Capacitors", ComponentLink1Description=http://www.mouser.com/ds/2/447/Yageo_UPY-GP_NP0_16V-to-50V_9-358835.pdf?src-supplier=Mouser, ComponentLink1URL=http://www.mouser.com/ds/2/447/Yageo_UPY-GP_NP0_16V-to-50V_9-358835.pdf?src-supplier=Mouser, ComponentLink2Description=http://www.yageo.com/documents/recent/UPY-GPHC_X5R_4V-to-50V_25.pdf?src-supplier=Digi-Key, ComponentLink2URL=http://www.yageo.com/documents/recent/UPY-GPHC_X5R_4V-to-50V_25.pdf?src-supplier=Digi-Key, Halogen Free="Halogen Free", Height=0.8mm, Lead Free="Lead Free", Length=0.063inch, Manufacturer Part Number=CC0603MRX5R6BB226, Mount="Surface Mount", Packaging="Tape and Reel", Pricing 1="1=0.68000, 10=0.48000, 50=0.36300, 100=0.31610, 500=0.23416, 1000=0.19903 (USD)", RoHS=Yes, RoHS Compliant=Yes, Stock 1=19628, Supplier 1=Digi-Key, Termination=SMD/SMT, Thickness=0.035inch, Voltage Rating (DC)=10V, Weight=7.1E-05oz, Width=0.8mm
C13 C18: library part GJM1555C1H7R0BB01D, "CAP CER 7PF 50V C0G/NP0 0402", Case Code (Imperial)=0402, Case Code (Metric)=1005, Dielectric=C0G, LCSC Part Number=C161333, Manufacturer=Murata, Max Operating Temperature=125°C, Min Operating Temperature=-55°C, Package Quantity=10000, Supplier Part Number 1=81-GJM1555C1H7R0BB1D, Voltage Rating=50V, Capacitance=7pF, Case/Package=0402, Category="Ceramic Capacitors", ComponentLink1Description=https://datasheet.ciiva.com/5411/murata20gjm20series-202929-5411552.pdf?src-supplier=Mouser, ComponentLink1URL=https://datasheet.ciiva.com/5411/murata20gjm20series-202929-5411552.pdf?src-supplier=Mouser, ComponentLink2Description=https://datasheet.ciiva.com/11611/product-11611018.pdf?src-supplier=Avnet, ComponentLink2URL=https://datasheet.ciiva.com/11611/product-11611018.pdf?src-supplier=Avnet, Construction=Flat, Depth=0.5mm, Height=0.5mm, Length=1mm, Manufacturer Part Number=GJM1555C1H7R0BB01D, Mount="Surface Mount", Packaging="Tape and Reel", Pricing 1="1=0.20000, 10=0.08000, 50=0.08000, 100=0.06500, 500=0.04600, 1000=0.03900, 2500=0.03300, 10000=0.02900, 20000=0.02700, 50000=0.02400 (USD)", Radiation Hardening=No, RoHS=Yes, RoHS Compliant=Yes, Series=GJM, Stock 1=9136, Supplier 1=Mouser, Termination=SMD/SMT, Thickness=0.022inch, Voltage Rating (DC)=50V, Width=0.5mm
C14: library part AC0603KRX7R0BB103, "CAP CER 10000PF 100V X7R 0603", Case Code (Imperial)=0603, Case Code (Metric)=1608, LCSC Part Number=C149602, Manufacturer=Yageo, Max Operating Temperature=125°C, Min Operating Temperature=-55°C, Ratings=AEC-Q200, Supplier Part Number 1=1985307, Tolerance=10%, Voltage Rating=100V, Capacitance=10nF, Case/Package=0603, Category="Ceramic Capacitors", ComponentLink1Description=http://www.yageo.com/NewPortal/_en/search/productDocs.jsp?YageoPartNumber=AC0603KRX7R0BB103&src-supplier=Digi-Key, ComponentLink1URL=http://www.yageo.com/NewPortal/_en/search/productDocs.jsp?YageoPartNumber=AC0603KRX7R0BB103&src-supplier=Digi-Key, ComponentLink2Description=https://www.yageo.com/upload/media/product/productsearch/datasheet/mlcc/UPY-AC_NP0X7R_16V-to-630V_12.pdf?src-supplier=Digi-Key, ComponentLink2URL=https://www.yageo.com/upload/media/product/productsearch/datasheet/mlcc/UPY-AC_NP0X7R_16V-to-630V_12.pdf?src-supplier=Digi-Key, Item Type=Capacitor, Lead Free="Lead Free", Manufacturer Part Number=AC0603KRX7R0BB103, Mount="Surface Mount", Packaging="Tape and Reel", Pricing 1="250=0.02700, 1000=0.02500, 2000=0.02100 (GBP)", RoHS=Yes, RoHS Compliant=Yes, Stock 1=750, Supplier 1=RSComponents
C20 C31: library part C1608X5R1E475KT000E, "CAP CER, 4.7 µF, 25 V, 0603", Case Code (Imperial)=0603, Case Code (Metric)=1608, Dielectric=X5R, Dielectric Material=Ceramic, LCSC Part Number=C76615, Manufacturer=TDK, Max Operating Temperature=85°C, Min Operating Temperature=-55°C, Package Quantity=4000, Supplier Part Number 1=2220Y1000562GCT-ND, Tolerance=10%, Voltage Rating=25V, Capacitance=4.7uF, Case/Package=0603, Category="Ceramic Capacitors", ComponentLink1Description=https://datasheet.ciiva.com/48587/6print-detail-pdf-phplangenpart-noc1608x5r1e475k080acimp-unit-xmhz-48587141.pdf?src-supplier=Onlinecomponents.com, ComponentLink1URL=https://datasheet.ciiva.com/48587/6print-detail-pdf-phplangenpart-noc1608x5r1e475k080acimp-unit-xmhz-48587141.pdf?src-supplier=Onlinecomponents.com, ComponentLink2Description=https://datasheet.ciiva.com/24216/mlcc-commercial-general-en-24216326.pdf?src-supplier=Mouser, ComponentLink2URL=https://datasheet.ciiva.com/24216/mlcc-commercial-general-en-24216326.pdf?src-supplier=Mouser, ComponentLink3Description=https://datasheet.ciiva.com/48671/mlcc-commercial-general-en-48671304.pdf?src-supplier=Avnet, ComponentLink3URL=https://datasheet.ciiva.com/48671/mlcc-commercial-general-en-48671304.pdf?src-supplier=Avnet, Depth=0.8mm, Height=0.8mm, Lead Free="Lead Free", Length=1.6mm, Manufacturer Part Number=C1608X5R1E475KT000E, Mount="Surface Mount", Packaging="Tape and Reel", Pricing 2="100=0.23400, 200=0.21900, 1000=0.20700, 2000=0.18700 (GBP)", REACH SVHC="No SVHC", Resistor Type=Ceramic, RoHS=No, Stock 2=16120, Supplier 1=Digi-Key, Supplier 2=RSComponents, Supplier Part Number 2=9159158P, Termination=SMD/SMT, Thickness=0.039inch, Voltage Rating (DC)=25V, Weight=7.1E-05oz, Width=0.031inch
C21 C32 C33 C40: library part CC0603KRX5R8BB105, "CAP CER 1UF 25V X5R 0603", Case Code (Imperial)=0603, Case Code (Metric)=1608, Dielectric=X5R, LCSC Part Number=C14664, Manufacturer=Yageo, Max Operating Temperature=85°C, Min Operating Temperature=-55°C, Package Quantity=1, Supplier Part Number 1=311-1445-1-ND, Tolerance=10%, Voltage Rating=25V, Capacitance=1uF, Case/Package=0603, Category="Ceramic Capacitors", ComponentLink1Description=https://datasheet.ciiva.com/176/mlccorderingcode-176785.pdf?src-supplier=Digi-Key, ComponentLink1URL=https://datasheet.ciiva.com/176/mlccorderingcode-176785.pdf?src-supplier=Digi-Key, ComponentLink2Description=https://datasheet.ciiva.com/176/mlccorderingcode-176786.pdf?src-supplier=Digi-Key, ComponentLink2URL=https://datasheet.ciiva.com/176/mlccorderingcode-176786.pdf?src-supplier=Digi-Key, ComponentLink3Description=https://datasheet.ciiva.com/176/mlccorderingcode-176787.pdf?src-supplier=Digi-Key, ComponentLink3URL=https://datasheet.ciiva.com/176/mlccorderingcode-176787.pdf?src-supplier=Digi-Key, ComponentLink4Description=https://datasheet.ciiva.com/17436/upy-gphc-x5r-4v-to-50v-12-17436952.pdf?src-supplier=Avnet+Europe, ComponentLink4URL=https://datasheet.ciiva.com/17436/upy-gphc-x5r-4v-to-50v-12-17436952.pdf?src-supplier=Avnet+Europe, ComponentLink5Description=https://datasheet.ciiva.com/7978/1525783-7978171.pdf?src-supplier=Element14, ComponentLink5URL=https://datasheet.ciiva.com/7978/1525783-7978171.pdf?src-supplier=Element14, ComponentLink6Description=https://datasheet.ciiva.com/11586/upy-gphc-x5r-4v-to-50v-12-11586318.pdf?src-supplier=Avnet, ComponentLink6URL=https://datasheet.ciiva.com/11586/upy-gphc-x5r-4v-to-50v-12-11586318.pdf?src-supplier=Avnet, Construction=Flat, Depth=0.8mm, Halogen Free="Halogen Free", Height=0.8mm, Item Type=Capacitor, Lead Free="Lead Free", Length=1.6mm, Manufacturer Part Number=CC0603KRX5R8BB105, Mount="Surface Mount", Number of Pins=2, Packaging="Tape and Reel", Pricing 1="1=0.12000, 10=0.08400, 50=0.04760, 100=0.03940, 500=0.02764, 1000=0.02288 (USD)", Radiation Hardening=No, REACH SVHC="No SVHC", RoHS=Yes, RoHS Compliant=Yes, Series=CC, Stock 1=919939, Supplier 1=Digi-Key, Termination=SMD/SMT, Thickness=0.035inch, Voltage Rating (DC)=25V, Width=0.031inch
C23 C24: library part CC0603JRNPO9BN200, "CAP CER 20PF 50V C0G/NPO 0603", Case Code (Imperial)=0603, Case Code (Metric)=1608, Dielectric=C0G, LCSC Part Number=C105621, Manufacturer=Yageo, Max Operating Temperature=125°C, Min Operating Temperature=-55°C, Package Quantity=4000, Supplier Part Number 1=311-1424-6-ND, Tolerance=5%, Voltage Rating=50V, Capacitance=20pF, Case/Package=0603, ComponentLink1Description=http://www.farnell.com/datasheets/1132289.pdf?src-supplier=Element14, ComponentLink1URL=http://www.farnell.com/datasheets/1132289.pdf?src-supplier=Element14, ComponentLink2Description=http://www.yageo.com/documents/recent/UPY-GP_NP0_16V-to-50V_16.pdf?src-supplier=Digi-Key, ComponentLink2URL=http://www.yageo.com/documents/recent/UPY-GP_NP0_16V-to-50V_16.pdf?src-supplier=Digi-Key, Composition=Ceramic, Depth=0.8mm, Lead Free="Lead Free", Length=1.6mm, Manufacturer Part Number=CC0603JRNPO9BN200, Mount="Surface Mount", Number of Pins=2, Packaging="Tape and Reel", Pricing 1="1=0.1, 10=0.048, 100=0.0214, 500=0.01526, 1000=0.01198 (USD)", REACH SVHC=Unknown, Stock 1=259568, Supplier 1=Digi-Key, Termination=SMD/SMT, Thickness=0.035inch, Voltage Rating (DC)=50V, Weight=7.1E-05oz, Width=0.8mm
C25 C26 C27 C28: library part C2012X5R1V226MT000E, "CAP CER 22UF 35V X5R 0805", LCSC Part Number=C338080, Manufacturer="TDK Corporation", Package=0805, ComponentLink1Description=LCSC, ComponentLink1URL=https://www.lcsc.com/product-detail/Multilayer-Ceramic-Capacitors-MLCC-SMD-SMT_TDK-C2012X5R1V226M125AC_C2179409.html, Item Type=Capacitor, Manufacturer Part Number=C2012X5R1V226MT000E
C30 C36: library part UUD1A102MNL1GS, "CAP ALUM 1000UF 20% 10V SMD", Case/Package=Radial, Dielectric Material=Aluminium, LCSC Part Number=C445277, Leakage Current=3uA, Manufacturer=Nichicon, Max Operating Temperature=105°C, Min Operating Temperature=-55°C, Package Quantity=1, Ripple Current=670mA, Tolerance=20%, Voltage=10V, Category="Aluminum Electrolytic Capacitors", ComponentLink1Description=https://datasheet.ciiva.com/98/e-ud-98263.pdf?src-supplier=Digi-Key, ComponentLink1URL=https://datasheet.ciiva.com/98/e-ud-98263.pdf?src-supplier=Digi-Key, ComponentLink2Description=https://datasheet.ciiva.com/16502/e-ud-16502759.pdf?src-supplier=Future+Electronics, ComponentLink2URL=https://datasheet.ciiva.com/16502/e-ud-16502759.pdf?src-supplier=Future+Electronics, ComponentLink3Description=https://datasheet.ciiva.com/98/e-ud-98264.pdf?src-supplier=Digi-Key, ComponentLink3URL=https://datasheet.ciiva.com/98/e-ud-98264.pdf?src-supplier=Digi-Key, ComponentLink4Description=https://datasheet.ciiva.com/28458/e-ud-28458024.pdf?src-supplier=Element14, ComponentLink4URL=https://datasheet.ciiva.com/28458/e-ud-28458024.pdf?src-supplier=Element14, ComponentLink5Description=https://datasheet.ciiva.com/98/e-ud-98265.pdf?src-supplier=Digi-Key, ComponentLink5URL=https://datasheet.ciiva.com/98/e-ud-98265.pdf?src-supplier=Digi-Key, ComponentLink6Description=https://datasheet.ciiva.com/7793/66055-7793131.pdf?src-supplier=Element14, ComponentLink6URL=https://datasheet.ciiva.com/7793/66055-7793131.pdf?src-supplier=Element14, ComponentLink7Description=https://datasheet.ciiva.com/22693/66055-22693549.pdf?src-supplier=Element14, ComponentLink7URL=https://datasheet.ciiva.com/22693/66055-22693549.pdf?src-supplier=Element14, Construction=Cylindrical, Diameter=10mm, Dissipation Factor=0.24%, Height=10mm, Height - Seated (Max)=0.394inch, Impedance=90mR, Item Type=Capacitor, Lead Diameter=1.1mm, Lead Free="Lead Free", Lead Pitch=4.5mm, Length=10mm, Life (Hours)=5000Hour, Manufacturer Part Number=UUD1A102MNL1GS, Packaging="Tape and Reel", Pins=2, Pricing 1="500=0.33690, 1000=0.29090, 2500=0.27810, 5000=0.26240, 12500=0.24280, 25000=0.24040 (USD)", Radiation Hardening=No, Reach SVHC Compliant=Yes, Ripple Current (AC)=670mA, RoHS=Yes, RoHS Compliant=Yes, Series=UD, Stock 1=26500, Supplier 1="Arrow Electronics", Supplier Part Number 1=UUD1A102MNL1GS, Termination=SMD/SMT, Voltage Rating=10V, Voltage Rating (DC)=10V
C37: library part GVT1C561M0810, "560uF 16V ±20% SMD,D8xL10.5mm Aluminum Electrolytic Capacitors - SMD ROHS", LCSC Part Number=C2980166, Manufacturer="Honor Elec", Package=SMD,D8xL10.5mm, ComponentLink1Description=LCSC, ComponentLink1URL=https://www.lcsc.com/product-detail/span-style-background-color-ff0-Aluminum-span-span-style-background-color-ff0-Electrolytic-span-span-style-background-color-ff0-Capacitors-span-span-style-background-color-ff0-SMD-span_Honor-Elec-GVT1C561M0810_C2980166.html, Item Type=Capacitor, Manufacturer Part Number=GVT1C561M0810
C38: library part C3216X5R1A107MT0A0E, "CAP CER, X5R, 10 V, 1206 [3216 Metric]", Case Code (Imperial)=1206, Case Code (Metric)=3216, Dielectric=X5R, Dielectric Material=Ceramic, Manufacturer=TDK, Manufacturer Part Number=C3216X5R1A107M160AC, Max Operating Temperature=85°C, Min Operating Temperature=-55°C, Package Quantity=1, Supplier Part Number 1=445-6007-1-ND, Tolerance=20%, Voltage=10V, Capacitance=100uF, Case/Package=1206, Category="Ceramic Capacitors", ComponentLink1Description=https://datasheet.ciiva.com/24216/c3216x5r1a107m160ac-265050-24216592.pdf?src-supplier=Mouser, ComponentLink1URL=https://datasheet.ciiva.com/24216/c3216x5r1a107m160ac-265050-24216592.pdf?src-supplier=Mouser, ComponentLink2Description=https://datasheet.ciiva.com/7975/1796654-7975125.pdf?src-supplier=Element14, ComponentLink2URL=https://datasheet.ciiva.com/7975/1796654-7975125.pdf?src-supplier=Element14, ComponentLink3Description=https://datasheet.ciiva.com/16482/e412-c-16482549.pdf?src-supplier=Future+Electronics, ComponentLink3URL=https://datasheet.ciiva.com/16482/e412-c-16482549.pdf?src-supplier=Future+Electronics, ComponentLink4Description=https://datasheet.ciiva.com/48671/e412-c-48671366.pdf?src-supplier=Avnet, ComponentLink4URL=https://datasheet.ciiva.com/48671/e412-c-48671366.pdf?src-supplier=Avnet, ComponentLink5Description=https://datasheet.ciiva.com/6284/tdkmlcccaprange-6284584.pdf?src-supplier=Digi-Key, ComponentLink5URL=https://datasheet.ciiva.com/6284/tdkmlcccaprange-6284584.pdf?src-supplier=Digi-Key, ComponentLink6Description=https://datasheet.ciiva.com/6284/tdkmlcccaprange-6284586.pdf?src-supplier=Digi-Key, ComponentLink6URL=https://datasheet.ciiva.com/6284/tdkmlcccaprange-6284586.pdf?src-supplier=Digi-Key, ComponentLink7Description=https://datasheet.ciiva.com/17487/e412-c-17487274.pdf?src-supplier=Avnet+Europe, ComponentLink7URL=https://datasheet.ciiva.com/17487/e412-c-17487274.pdf?src-supplier=Avnet+Europe, ComponentLink8Description=https://datasheet.ciiva.com/28620/mlcc-commercial-general-en-28620362.pdf?src-supplier=Element14, ComponentLink8URL=https://datasheet.ciiva.com/28620/mlcc-commercial-general-en-28620362.pdf?src-supplier=Element14, ComponentLink9Description=https://datasheet.ciiva.com/22725/1913358-22725579.pdf?src-supplier=Element14, ComponentLink9URL=https://datasheet.ciiva.com/22725/1913358-22725579.pdf?src-supplier=Element14, ComponentLink10Description=https://datasheet.ciiva.com/6284/tdkmlcccaprange-6284588.pdf?src-supplier=Digi-Key, ComponentLink10URL=https://datasheet.ciiva.com/6284/tdkmlcccaprange-6284588.pdf?src-supplier=Digi-Key, ComponentLink11Description=https://datasheet.ciiva.com/22694/1796654-22694157.pdf?src-supplier=Element14, ComponentLink11URL=https://datasheet.ciiva.com/22694/1796654-22694157.pdf?src-supplier=Element14, Construction=Flat, Depth=1.6mm, Height=1.6mm, Lead Free="Lead Free", Length=3.2mm, Mount="Surface Mount", Packaging="Tape and Reel", Pricing 1="1=1.42000, 10=1.11800, 50=0.96900, 100=0.83860, 500=0.63362, 1000=0.55907 (USD)", Radiation Hardening=No, REACH SVHC="No SVHC", Resistor Type=Ceramic, RoHS=Yes, RoHS Compliant=Yes, Series=C, Stock 1=254695, Supplier 1=Digi-Key, Termination=SMD/SMT, Thickness=0.075inch, Voltage Rating=10V, Voltage Rating (DC)=10V, Weight=0.000571oz, Width=1.6mm
C41 C55: library part CC0603JRNPO8BN102, "CAP CER 1000PF 25V C0G/NPO 0603", Case Code (Imperial)=0603, Case Code (Metric)=1608, Dielectric=C0G, LCSC Part Number=C309470, Manufacturer=Yageo, Max Operating Temperature=125°C, Min Operating Temperature=-55°C, Package Quantity=1, Supplier Part Number 1=311-1342-1-ND, Tolerance=5%, Voltage Rating=25V, Capacitance=1nF, Case/Package=0603, ComponentLink1Description=http://www.farnell.com/datasheets/1132289.pdf?src-supplier=Element14, ComponentLink1URL=http://www.farnell.com/datasheets/1132289.pdf?src-supplier=Element14, ComponentLink2Description=http://www.farnell.com/datasheets/2213336.pdf?src-supplier=Element14, ComponentLink2URL=http://www.farnell.com/datasheets/2213336.pdf?src-supplier=Element14, ComponentLink3Description=http://www.yageo.com/documents/recent/UPY-GP_NP0_16V-to-50V_16.pdf?src-supplier=Digi-Key, ComponentLink3URL=http://www.yageo.com/documents/recent/UPY-GP_NP0_16V-to-50V_16.pdf?src-supplier=Digi-Key, ComponentLink4Description=http://www.yageo.com/exep/pages/download/literatures/ProductSelectionGuide%202014_Final_2.pdf?src-supplier=Digi-Key, ComponentLink4URL=http://www.yageo.com/exep/pages/download/literatures/ProductSelectionGuide%202014_Final_2.pdf?src-supplier=Digi-Key, ComponentLink5Description=http://www.yageo.com/documents/recent/UPY-GP_NP0_16V-to-50V_8.pdf?src-supplier=Avnet, ComponentLink5URL=http://www.yageo.com/documents/recent/UPY-GP_NP0_16V-to-50V_8.pdf?src-supplier=Avnet, ComponentLink6Description=https://www.verical.com/server-webapp/html/getDatasheet?partID=403523&src-supplier=Verical, ComponentLink6URL=https://www.verical.com/server-webapp/html/getDatasheet?partID=403523&src-supplier=Verical, ComponentLink7Description=http://www.yageo.com/documents/recent/UPY-GP_NP0_16V-to-50V_8.pdf?src-supplier=Avnet+Europe, ComponentLink7URL=http://www.yageo.com/documents/recent/UPY-GP_NP0_16V-to-50V_8.pdf?src-supplier=Avnet+Europe, Construction=Flat, Depth=0.8mm, Height=0.8mm, Lead Free="Lead Free", Length=1.6mm, Manufacturer Part Number=CC0603JRNPO8BN102, Mount="Surface Mount", Packaging="Tape and Reel", Pricing 1="1=0.1, 10=0.072, 50=0.0394, 100=0.0322, 500=0.02298, 1000=0.01806 (USD)", Radiation Hardening=No, REACH SVHC=Unknown, RoHS Compliant=Yes, Series=CC, Stock 1=290818, Supplier 1=Digi-Key, Termination=SMD/SMT, Thickness=0.035inch, Voltage Rating (DC)=25V, Width=0.031inch
D1 D2 D5: "0.5mA@40V 40V Single 3A 0.55V@3A SMA(DO-214AC) Schottky Barrier Diodes (SBD) ROHS", LCSC Part Number=C8678, Manufacturer=MDD, Package=SMA(DO-214AC), ComponentLink1Description=LCSC, ComponentLink1URL=https://www.lcsc.com/product-detail/Schottky-Barrier-Diodes-SBD_MDD-Microdiode-Electronics-SS34_C8678.html, Item Type=Diode, Manufacturer Part Number=SS34
D3: "16A 20V 7V 5V@Max Unidirectional SOT-23 TVS ROHS", LCSC Part Number=C239643, Manufacturer=WILLSEMI, Package=SOT-23, ComponentLink1Description=LCSC, ComponentLink1URL=https://www.lcsc.com/product-detail/TVS_WILLSEMI-Will-Semicon-ESD5302F-3-TR_C239643.html, Item Type=Diode, Manufacturer Part Number=ESD5302F-3/TR
D4: "TVS DIODE 5VWM 6.3VC DSN0603-2", LCSC Part Number=C477989, Manufacturer=Nexperia, Category="ESD and Circuit Protection ICs", ComponentLink1Description=http://www.farnell.com/datasheets/1961312.pdf?src-supplier=Farnell, ComponentLink1URL=http://www.farnell.com/datasheets/1961312.pdf?src-supplier=Farnell, ComponentLink2Description=https://assets.nexperia.com/documents/data-sheet/PESD5V0H1BSF.pdf?src-supplier=Digi-Key, ComponentLink2URL=https://assets.nexperia.com/documents/data-sheet/PESD5V0H1BSF.pdf?src-supplier=Digi-Key, ComponentLink3Description=http://www.farnell.com/datasheets/1961312.pdf?src-supplier=Newark, ComponentLink3URL=http://www.farnell.com/datasheets/1961312.pdf?src-supplier=Newark, Item Type=Diode, Manufacturer Part Number=PESD5V0H1BSFYL, Pricing 1="18000=0.06453, 36000=0.06278, 54000=0.06104, 90000=0.05930, 180000=0.05755, 900000=0.05581, 1800000=0.05406 (USD)", RoHS=Yes, RoHS Compliant=Yes, Stock 1=9000, Supplier 1=Avnet, Supplier Part Number 1=PESD5V0H1BSFYL
F1: "6V 500mA 40A 1A 0603 Resettable Fuses ROHS", Manufacturer=TECHFUSE, Supplier Part Number 1=C69679, Category=Uncategorized, Manufacturer Part Number=SMD0603-050, RoHS=No, Supplier 1=LCSC
FB1: library part BLM31PG121SN1L, "FERRITE BEAD 120 OHM 1206 1LN", Case Code (Imperial)=1206, Case Code (Metric)=3216, Current Rating=3.5A, DC Current=3A, DC Resistance (DCR)=20mR, LCSC Part Number=C85841, Manufacturer=Murata, Max Operating Temperature=125°C, Min Operating Temperature=-55°C, Package Quantity=3000, Tolerance=25%, Case/Package=1206, Category="Ferrite Beads and Chips", ComponentLink1Description=https://datasheet.ciiva.com/19460/1845419-19460234.pdf?src-supplier=Jameco, ComponentLink1URL=https://datasheet.ciiva.com/19460/1845419-19460234.pdf?src-supplier=Jameco, ComponentLink2Description=https://datasheet.ciiva.com/1012/l0132s0193blm31p-1012992.pdf?src-supplier=Digi-Key, ComponentLink2URL=https://datasheet.ciiva.com/1012/l0132s0193blm31p-1012992.pdf?src-supplier=Digi-Key, ComponentLink3Description=https://datasheet.ciiva.com/11799/0900766b811b5866-11799444.pdf?src-supplier=RSComponents, ComponentLink3URL=https://datasheet.ciiva.com/11799/0900766b811b5866-11799444.pdf?src-supplier=RSComponents, ComponentLink4Description=https://datasheet.ciiva.com/3081/l0110s0100blm31p-3081665.pdf?src-supplier=Avnet, ComponentLink4URL=https://datasheet.ciiva.com/3081/l0110s0100blm31p-3081665.pdf?src-supplier=Avnet, ComponentLink5Description=https://datasheet.ciiva.com/41449/001172383-da-01-en-drossel-1206-120r-3-2x1-60mm-3000st-41449554.pdf?src-supplier=Conrad, ComponentLink5URL=https://datasheet.ciiva.com/41449/001172383-da-01-en-drossel-1206-120r-3-2x1-60mm-3000st-41449554.pdf?src-supplier=Conrad, ComponentLink6Description=https://datasheet.ciiva.com/29348/442557-da-01-en-chip-drossel-1206-120r-3000ma-3-2x1-60mm-29348014.pdf?src-supplier=Conrad, ComponentLink6URL=https://datasheet.ciiva.com/29348/442557-da-01-en-chip-drossel-1206-120r-3000ma-3-2x1-60mm-29348014.pdf?src-supplier=Conrad, ComponentLink7Description=https://datasheet.ciiva.com/14122/apblm31p-data-e-14122856.pdf?src-supplier=Distrelec, ComponentLink7URL=https://datasheet.ciiva.com/14122/apblm31p-data-e-14122856.pdf?src-supplier=Distrelec, ComponentLink8Description=https://datasheet.ciiva.com/48436/blm31pg121sn1l-eng-tds-48436731.pdf?src-supplier=Distrelec, ComponentLink8URL=https://datasheet.ciiva.com/48436/blm31pg121sn1l-eng-tds-48436731.pdf?src-supplier=Distrelec, ComponentLink9Description=https://datasheet.ciiva.com/1012/l0110s0100blm31p-1012991.pdf?src-supplier=Digi-Key, ComponentLink9URL=https://datasheet.ciiva.com/1012/l0110s0100blm31p-1012991.pdf?src-supplier=Digi-Key, ComponentLink10Description=https://datasheet.ciiva.com/1012/l0110s0100blm31p-1012993.pdf?src-supplier=Digi-Key, ComponentLink10URL=https://datasheet.ciiva.com/1012/l0110s0100blm31p-1012993.pdf?src-supplier=Digi-Key, ComponentLink11Description=https://datasheet.ciiva.com/3081/l0110s0100blm31p-3081666.pdf?src-supplier=Avnet, ComponentLink11URL=https://datasheet.ciiva.com/3081/l0110s0100blm31p-3081666.pdf?src-supplier=Avnet, ComponentLink12Description=https://datasheet.ciiva.com/16390/l0110s0100blm31p-16390857.pdf?src-supplier=Future+Electronics, ComponentLink12URL=https://datasheet.ciiva.com/16390/l0110s0100blm31p-16390857.pdf?src-supplier=Future+Electronics, ComponentLink13Description=https://datasheet.ciiva.com/18093/getdatasheetpartid-152966-18093084.pdf?src-supplier=Verical, ComponentLink13URL=https://datasheet.ciiva.com/18093/getdatasheetpartid-152966-18093084.pdf?src-supplier=Verical, Contact Plating=Tin,Matte, Core Material=Ferrite, Depth=1.6mm, Frequency=100MHz, Height=1.1mm, Impedance=120R, Item Type="Ferrite Bead", Lead Free="Lead Free", Length=3.2mm, Manufacturer Part Number=BLM31PG121SN1L, Material=Steel,Ferrite, Max Current Rating=3.5A, Max DC Current=3A, Military Standard=Not, Number of Lines=1, Number of Pins=2, Packaging="Tape and Reel", Pricing 1="3000=0.11563, 6000=0.10938, 12000=0.10313, 18000=0.09688, 24000=0.09063, 30000=0.08438, 300000=0.07813 (USD)", Radiation Hardening=No, RoHS=Yes, RoHS Compliant=Yes, Shielding=Unshielded, Stock 1=290640, Supplier 1=Avnet, Supplier Part Number 1=BLM31PG121SN1L, Termination=SMD/SMT, Test Frequency=100MHz, Width=1.6mm
J1 J3 J5 J6 J7 J8 J9: "Wire Connecting Pad", Item Type="THrough Hole Pads", Manufacturer Part Number="2P THrough Hole Pads"
J2 J10: "Wire Connecting Pads", Item Type="Through Hole Pads", Manufacturer Part Number="5P Through Hole Pads"
J4: "CONN RCPT USB2.0 MICRO B SMD", Contact Resistance=30mR, Dielectric Withstanding Voltage (AC)=140V, Flammability Rating="UL94 V-0", Insulation Resistance=1GR, LCSC Part Number=C586226, Manufacturer=Molex, Max Operating Temperature=85°C, Min Operating Temperature=-30°C, Rated Current (Signal)=1A, Body Breadth=0.118inch, Body Depth=0.264inch, Body Length=0.315inch, Category="USB Connectors", ComponentLink1Description=https://datasheet.ciiva.com:443/pdfs/VipMasterIC/IC/MOLE/MOLE-S-A0000025294/MOLE-S-A0000025294-1.pdf?src-supplier=IHS+Markit, ComponentLink1URL=https://datasheet.ciiva.com:443/pdfs/VipMasterIC/IC/MOLE/MOLE-S-A0000025294/MOLE-S-A0000025294-1.pdf?src-supplier=IHS+Markit, ComponentLink2Description=https://datasheet.ciiva.com/29660/1051330011-sd-29660273.pdf?src-supplier=Digi-Key, ComponentLink2URL=https://datasheet.ciiva.com/29660/1051330011-sd-29660273.pdf?src-supplier=Digi-Key, ComponentLink3Description=https://datasheet.ciiva.com/15181/getdatasheetpartid-719072-15181485.pdf?src-supplier=Verical, ComponentLink3URL=https://datasheet.ciiva.com/15181/getdatasheetpartid-719072-15181485.pdf?src-supplier=Verical, Connector Type="TELECOM AND DATACOM CONNECTOR", Contact Finish - Mating="NOT SPECIFIED", Contact Finish - Termination="Gold (Au) - with Nickel (Ni) barrier", Contact Gender=Female, Contact Material="Copper Alloy", Contact Style=USB, DIN Conformance=No, Durability=10000Cycles, Empty Shell=No, Filter Feature=No, IEC Conformance=No, Insulation Material=Polyethylene, Item Type="USB Connector", JESD-609 Code=e4, Manufacturer Part Number=105133-0011, MIL Conformance=No, Mixed Contacts=No, Mounting Option 1=LOCKING, Mounting Style=STRAIGHT, Mounting Technology=Board, Number Of Connectors=1, Number of Contacts=5, Number Of PCB Rows=1, Option="General Purpose", PCB Contact Pattern=RECTANGULAR, Polarization Key="POLARIZED HOUSING", Pricing 1="500=1.01170 (USD)", Reach SVHC Compliant=Yes, Reference Standard=UL, Reliability=COMMERCIAL, RoHS=Yes, RoHS Compliant=Yes, Shell Finish=Tin, Shell Material="Stainless Steel", Stock 1=12800, Supplier 1=Avnet, Supplier Part Number 1=105133-0011, Terminal Pitch=0.6604mm, Termination=SMD/SMT